# Altium PCB AHPR_Power_Management_and_Controls_Board.PcbDoc (part 2 of 2)
Units mil, origin at the board's own origin, x right, y up, seen from the top; angles counter-clockwise.
Board outline 2559.06 x 2204.72 mil, 2 copper layers (Top Layer, Bottom Layer), stack 63 mil thick; 89 components, 40 nets, 283 pads, 121 vias.
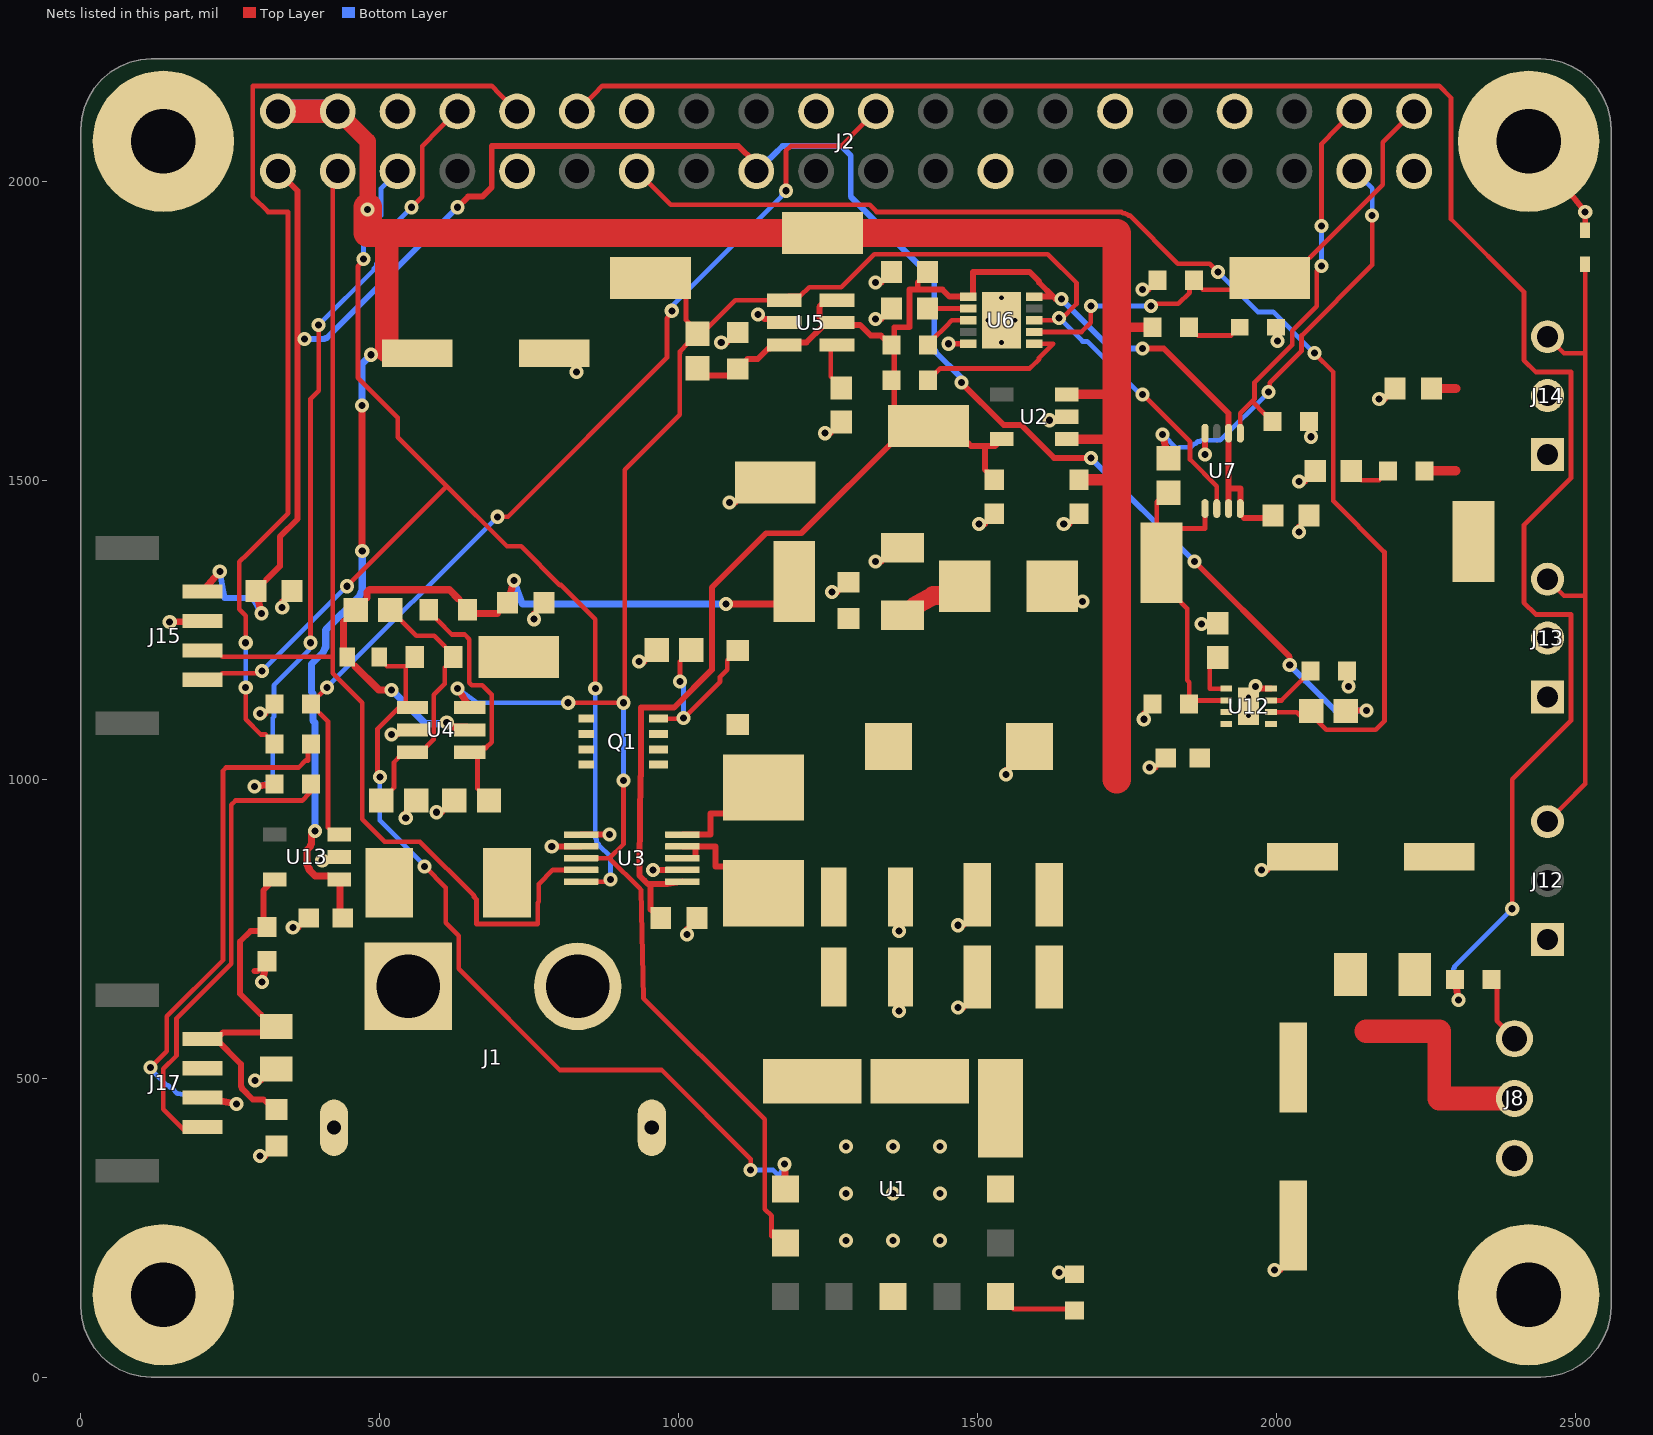
[diagram p2: the nets of this part, all layers, seen from the top]

## Part data (continued)
R52: library part CMP-2000-06932-2, "RES 20K OHM 1% 1/10W 0603 / 20 kOhms Â±1% 0.1W, 1/10W Chip Resistor 0603 (1608 Metric) Moisture Resistant Thick Film /  / SMD-RES-20K-1%-1/10W(0603) /  / https://octopart.com/part/yageo-group/RC0603FR-0720KL?slid=9dd42130-19c2-4799-ac31-5afd2b72cd34&ssid=b984c5c9-64c8-4793-b112-fa8b90893e5e#CadModels", Case Code (Imperial)=0603, Case Code (Metric)=1608, Max Operating Temperature=155°C, Max Power Dissipation=100mW, Min Operating Temperature=-55°C, Package Quantity=1, Resistance=20kR, Resistance Tolerance=1%, Resistor Type="Thick Film", Temperature Coefficient=100ppm/°C, Voltage Rating=50V, Case/Package=0603, Construction=Rectangular, Depth=0.8mm, Features="Moisture Resistant", Height=0.022inch, Lead Free="Lead Free", Length=0.063inch, Military Standard=Not, Number of Pins=2, Number of Terminations=2, Packaging="Tape and Reel", Power Rating=100mW, REACH SVHC="No SVHC", RoHS Compliant=Yes, Series=RC, Size Code=0603, Technology="THICK FILM", Termination=SMD/SMT, Tolerance=1%, Voltage Rating (DC)=50V, Width=0.031inch
R53: library part RC0603FR-072M2L, "Äiá»‡n trá»Ÿ mÃ ng dÃ y gáº¯n bá» máº·t, DÃ²ng RC, 2,2 Mohm, 100 mW, - 1%, 50 V, 0603 [1608 Metric] /  / RC0603FR-072M2L /  / https://octopart.com/part/yageo-group/RC0603FR-072M2L?slid=d71ab9d8-a679-4832-96ed-b1c44a9cfdb9&ssid=0251966b-910a-4a6a-9854-0248babda200#CadModels", Package="1608 Yageo", Check_prices=https://www.snapeda.com/parts/RC0603FR-072M2L/Yageo/view-part/?ref=eda, MF=Yageo, MP=RC0603FR-072M2L, SnapEDA_Link=https://www.snapeda.com/parts/RC0603FR-072M2L/Yageo/view-part/?ref=snap
R54: library part RC0603FR-07100KL, "RES, 100 k, 1%, 0.1 W, 0603 / Yageo RC0603FR-07100KL / 100 kΩ 1 % / 0603 / HEARTBEAT pulldown: TI says WDI must never float, and the Pi pin is Hi-Z while it boots / https://www.digikey.com/en/products/result?keywords=RC0603FR-07100KL", Manufacturer_Name=Yageo, Copyright="Copyright (C) 2025 Ultra Librarian. All rights reserved.", Manufacturer_Part_Number=RC0603FR-07100KL
R55: library part RC0603FR-07562RL, "Yageo RC0603FR-07562RL / 562 Ω 1 % / 0603 / ILM: I_LIM = 2000 / 562 + 0.04 ≈ 3.6 A (verify equation) / https://www.digikey.com/en/products/result?keywords=RC0603FR-07562RL", Manufacturer_Name=Yageo, Copyright="Copyright (C) 2026 Ultra Librarian. All rights reserved.", Manufacturer_Part_Number=RC0603FR-07562RL
R56: library part RC0603FR-07100KL, "RES, 100 k, 1%, 0.1 W, 0603 / Yageo RC0603FR-07100KL / 100 kΩ 1 % / 0603 / U12 EN pulldown: actuators off by default / https://www.digikey.com/en/products/result?keywords=RC0603FR-07100KL", Manufacturer_Name=Yageo, Copyright="Copyright (C) 2025 Ultra Librarian. All rights reserved.", Manufacturer_Part_Number=RC0603FR-07100KL
R57: library part RC0603FR-0710KL, "10 kOhms Â±1% 0.1W, 1/10W Chip Resistor 0603 (1608 Metric) Moisture Resistant Thick Film / Yageo RC0603FR-0710KL / 10 kΩ 1 % / 0603 / FLT pull-up to +3V3_PI (ACT_FAULT_n) / https://www.digikey.com/en/products/result?keywords=RC0603FR-0710KL", Package="0603 Yageo", Check_prices=https://www.snapeda.com/parts/RC0603FR-0710KL/Yageo/view-part/?ref=eda, MF=Yageo, MP=RC0603FR-0710KL, SnapEDA_Link=https://www.snapeda.com/parts/RC0603FR-0710KL/Yageo/view-part/?ref=snap
R58 R59: library part RC0603FR-071KL, "RES SMD 1K OHM 1% 1/10W 0603 / Yageo RC0603FR-071KL / 1 kΩ 1 % / 0603 / UART series to the rangefinder: limits back-feed into its pins while it is unpowered / https://www.digikey.com/en/products/result?keywords=RC0603FR-071KL", Manufacturer_Name=Yageo, Copyright="Copyright (C) 2025 Ultra Librarian. All rights reserved.", Manufacturer_Part_Number=RC0603FR-071KL
R62: library part RC0603FR-07100KL, "RES, 100 k, 1%, 0.1 W, 0603 / Yageo RC0603FR-07100KL / 100 kΩ 1 % / 0603 / RF_POWER_EN pulldown: rangefinder off at boot / https://www.digikey.com/en/products/result?keywords=RC0603FR-07100KL", Manufacturer_Name=Yageo, Copyright="Copyright (C) 2025 Ultra Librarian. All rights reserved.", Manufacturer_Part_Number=RC0603FR-07100KL
"TP1 VBAT_RAW" TP2 "TP3 GND": "Test Point Micro Mini SMT Phos Bronze/Silver 1000pc Tape & Reel", Package=None, Check_prices=https://www.snapeda.com/parts/5015/Keystone/view-part/?ref=eda, MF="Keystone Electronics", MP=5015, SnapEDA_Link=https://www.snapeda.com/parts/5015/Keystone/view-part/?ref=snap
TP4 TP5 TP6 TP7 TP8 TP9: library part 5015, "Test Point Micro Mini SMT Phos Bronze/Silver 1000pc Tape & Reel", Package=None, Check_prices=https://www.snapeda.com/parts/5015/Keystone/view-part/?ref=eda, MF="Keystone Electronics", MP=5015, SnapEDA_Link=https://www.snapeda.com/parts/5015/Keystone/view-part/?ref=snap
U1: library part OKL-T_6-W12P-C, "MURATA POWER SOLUTIONS - OKL-T/6-W12P-C - DC-DC CONVERTER, 0.591V TO 5.5V, MODULE", Arrow Part Number=OKL-T/6-W12P-C, Manufacturer_Name="Murata Electronics", Mouser Part Number=580-OKL-T/6-W12P-C, Arrow Price/Stock=https://www.arrow.com/en/products/okl-t6-w12p-c/murata-power-solutions?region=nac, Datasheet Link=https://www.murata.com/products/productdata/8807038255134/okl-t6-w12.pdf?1583754815000, Geometry.Height=7.2mm, Manufacturer_Part_Number=OKL-T/6-W12P-C, Mouser Price/Stock=https://www.mouser.co.uk/ProductDetail/Murata-Power-Solutions/OKL-T-6-W12P-C?qs=CxV9Ey7RZVdXGDAP%2FweYNg%3D%3D
U2: library part TLV75533PDBVR, "500mA high-PSRR low-I<sub>Q</sub> low-dropout voltage regulator with enable 5-SOT-23 -40 to 125 / TI TLV75533PDBVR / 3.3 V 500 mA LDO /  / https://www.digikey.com/en/products/detail/texas-instruments/TLV75533PDBVR/9356541", Manufacturer_Name="Texas Instruments", Copyright="Copyright (C) 2026 Ultra Librarian. All rights reserved.", Manufacturer_Part_Number=TLV75533PDBVR, RefDes=RefDes, Type=TYPE
U3: "36V, 16-bit, ultra-precise i2c output current/voltage/power monitor w/alert", Package="VSSOP-10 Texas Instruments", Check_prices=https://www.snapeda.com/parts/INA226AIDGSR/Texas+Instruments/view-part/?ref=eda, MF="Texas Instruments", MP=INA226AIDGSR, SnapEDA_Link=https://www.snapeda.com/parts/INA226AIDGSR/Texas+Instruments/view-part/?ref=snap
U4: "High-voltage (18-V) window voltage detector for overvoltage and undervoltage monitoring 6-SOT-23-THIN -40 to 125", Manufacturer_Name="Texas Instruments", Copyright="Copyright (C) 2026 Ultra Librarian. All rights reserved.", Manufacturer_Part_Number=TPS3700DDCR, RefDes=RefDes, Type=Type
U5: library part TPS3808G33DBVR, "Low-quiescent current supervisor with programmable delay & manual reset 6-SOT-23 -40 to 125", Manufacturer_Name="Texas Instruments", Copyright="Copyright (C) 2025 Ultra Librarian. All rights reserved.", Manufacturer_Part_Number=TPS3808G33DBVR, RefDes=RefDes, Type=Type
U6: library part TPS3430WDRCR, "Window watchdog timer with programmable reset delay 10-VSON -40 to 125", Manufacturer_Name="Texas Instruments", Copyright="Copyright (C) 2026 Ultra Librarian. All rights reserved.", Manufacturer_Part_Number=TPS3430WDRCR, RefDes=RefDes, Type=TYPE
U7: library part SN74LVC1G74DCUR, "Single Positive-Edge-Triggered D-Type Flip-Flop With Clear and Preset 8-VSSOP -40 to 125", Alternate_PartNumber=SN74LVC1G74DCUT, Manufacturer="Texas Instruments", CompType=IC, Copyright="Copyright (C) 2026 Ultra Librarian. All rights reserved.", Manufacturer_Name="Texas Instruments", Manufacturer_Part_Number=SN74LVC1G74DCUR, MountType=SMT, PackageReference=DCU0008A, PartNumber=SN74LVC1G74DCUR, RefDes=RefDes, RoHS=Y, Type=TYPE
U12: "2.7-V to 18-V, 34m&Omega;, 0.5-4A eFuse with over voltage protection in small WSON package 8-WSON -40 to 125", Manufacturer_Name="Texas Instruments", Copyright="Copyright (C) 2025 Ultra Librarian. All rights reserved.", Manufacturer_Part_Number=TPS259530DSGR, RefDes=RefDes, Type=TYPE
U13: library part TLV75533PDBVR, "500mA high-PSRR low-I<sub>Q</sub> low-dropout voltage regulator with enable 5-SOT-23 -40 to 125 / TI TLV75533PDBVR / 3.3 V 500 mA LDO with enable / SOT-23-5 / +3V3_RF for the rangefinder; EN = RF_POWER_EN (GPIO25) / https://www.digikey.com/en/products/detail/texas-instruments/TLV75533PDBVR/9356541", Manufacturer_Name="Texas Instruments", Copyright="Copyright (C) 2026 Ultra Librarian. All rights reserved.", Manufacturer_Part_Number=TLV75533PDBVR, RefDes=RefDes, Type=TYPE

## Via types
v1: diameter 23.62, hole 11.81, Top Layer to Bottom Layer, 121 vias

## Nets (pads, with @x,y where several pads share a name; then routed paths per layer and width w, separated by ;. In a path a pad name is that pad's centre, name@x,y a point inside that pad or via, vN(x,y) a via of type N, cw(c..) or ccw(c..) an arc to the next point about the centre after c; other vN are vias at no path point)
+3V3_LOGIC: C4.1 C12.1 C27.2 C28.2 C30.2 R33.2 R34.2 R35.1 TP5.TP U2.5 U3.6 U5.3 U5.5 U5.6 U6.1 U6.10 U7.2 U7.7 U7.8 | length 2694.6
  Top Layer w9.84: 947.41,825.44 942.28,830.57 934.06,839.05 934.06,857.8 935.95,1004.85 937.01,1005.91 937.01,1120.08 992.13,1120.08 1055.12,1183.07 1055.12,1320.87 1145.67,1411.42 1204.72,1411.42 TP5.TP@1366.65,1573.35 ; 948.17,824.8 952.76,824.8 981.23,824.8 1002.2,828.15 U3.6@1005.91,828.74 ; 952.76,823.82 952.76,782.24 C4.1@960,775 ; R35.1@1050.35,1675 1079.88,1675 ; C27.2@1098.43,1686.22 1114.96,1702.76 1131.89,1702.76 1149.43,1720.3 1152.39,1720.3 1156.1,1724.01 U5.3@1156.1,1726.97 ; U5.3@1180.97,1725 1186.6,1730.63 1213.41,1730.63 1240.39,1757.61 1240.39,1757.7 1241.33,1758.64 U5.5@1241.42,1758.64 ; U5.5@1240,1765 1235,1770 1235,1790 U5.6@1245,1800 ; U5.5@1264.47,1763.78 1268.25,1760 1302.99,1760 1320.87,1742.13 1337.87,1742.13 R33.2@1345,1735 ; TP5.TP@1360.24,1624.02 1360.24,1726.38 1360.24,1755.91 1385.83,1755.91 1385.83,1818.9 1399.61,1818.9 ; C28.2@1399.61,1830.71 1399.61,1818.9 ; TP5.TP@1482.99,1562.8 1488.7,1557.09 1511.81,1557.09 ; U6.1@1484.25,1807.09 1452.76,1807.09 1440.94,1818.9 1399.61,1818.9 ; U6.1@1492.13,1812.99 1492.13,1848.43 1586.61,1848.43 1602.36,1832.68 1602.36,1830.71 1625.98,1807.09 ; C12.1@1520,1510 1511.81,1518.19 1511.81,1557.09 ; U2.5@1540.35,1568.9 1528.54,1557.09 1511.81,1557.09 ; U6.10@1594.49,1807.09 1625.98,1807.09 ; v1(1639.76,1803.15) 1629.92,1803.15 1625.98,1807.09 ; v1(1775.59,1720.47) 1811.02,1720.47 1919.29,1612.2 U7.2@1919.29,1578.74 ; U7.7@1919.29,1452.76 1919.29,1486.22 ; U7.2@1919.29,1562.99 1919.29,1486.22 ; U7.8@1938.98,1452.76 1938.98,1486.22 1919.29,1486.22 ; 1944.88,1437.01 C30.2@1976.38,1437.01
  Bottom Layer w9.84: v1(1639.76,1803.15) 1722.44,1720.47 v1(1775.59,1720.47)
+3V3_PI: C42.2 J2.1 J2.17 J15.1 R57.2 | length 3475.8
  Top Layer w9.84: C42.2@309.06,1332.68 332.68,1356.3 332.68,1405.51 362.2,1435.04 362.2,1736.22 ; J2.1@329.53,2016.93 362.2,1984.25 362.2,1736.22 ; v1(374.02,1736.22) 362.2,1736.22 ; v1(629.92,1956.69) 647.64,1974.41 671.26,1974.41 687.01,1990.16 687.01,2059.06 1099.29,2059.06 1126.47,2032.61 1129.35,2029.73 J2.17@1129.53,2016.93 ; v1(1472.44,1663.39) 1543.31,1592.52 1572.48,1592.52 1627.6,1537.4 v1(1688.98,1537.4) ; v1(1862.2,1364.17) 2021.65,1204.72 v1(2021.65,1190.94) ; R57.2@2115.55,1114.17 2116.38,1115 v1(2150,1115)
  Top Layer w11.81: J15.1@203.74,1313.98 v1(232.28,1347.76) ; C42.2@292.52,1314.96 v1(302.17,1277.56)
  Bottom Layer w9.84: v1(232.28,1347.76) 240.16,1303.15 287.4,1303.15 v1(302.17,1277.56) ; v1(374.02,1736.22) 407.48,1736.22 409.45,1738.19 411.42,1738.19 v1(629.92,1956.69) ; J2.17@1129.53,2016.93 1159.45,2045.28 1173.23,2059.06 1271.65,2059.06 1287.4,2043.31 1287.4,1974.41 1427.17,1834.65 1427.17,1718.5 1429.13,1716.54 1429.13,1714.57 1472.44,1671.26 v1(1472.44,1663.39) ; v1(1688.98,1537.4) v1(1862.2,1364.17) ; v1(2021.65,1190.94) 2076.77,1135.83 2097.28,1115.32 v1@2149.68,1115.32
+3V3_RF: C44.2 C46.2 C47.2 J17.1 U13.5 | length 513.5
  Top Layer w9.84: J17.1@215,565 J17.1@226.34,565 ; C46.2@295.28,746.06 283.46,746.06 266.15,728.75 266.15,641.33 C47.2@301.18,606.3 ; C47.2@301.18,576.77 238.11,576.77 J17.1@226.34,565 ; C46.2@305.12,769.69 305.12,813.98 U13.5@323.82,832.68 ; C44.2@330,440 305.43,464.57 287.4,464.57 269.68,482.28 269.68,484.25 267.72,486.22 267.72,523.62 J17.1@226.34,565
+5V: C8.2 C9.2 C10.1 C11.1 C38.2 C45.2 J2.2 J2.4 R10.2 TP4.TP U1.4 U1.5 U2.1 U2.3 U12.3 U12.4 U13.1 | length 4343.8
  Top Layer w11.81: v1(391.73,913.39) 385.83,907.48 385.83,891.73 383.86,889.76 383.86,887.8 377.95,881.89 377.95,856.3 379.92,854.33 379.92,852.36 381.89,850.39 381.89,848.43 391.73,838.58 U13.1@413.39,838.58 ; C45.2@433.07,783.46 U13.1@433.07,820.87 ; v1(470,1625) 470.24,1624.76 470.24,1382.13 v1(470.47,1381.89) ; v1(485,1710) 524.5,1710 527.09,1712.6 C10.1@562.67,1712.6
  Top Layer w15.75: U2.1@1661.42,1568.9 1732.28,1568.9 ; U2.3@1661.42,1643.7 1732.28,1643.7 ; 1732.28,1755.91 R10.2@1791.34,1755.91
  Top Layer w19.68: C11.1@1669.29,1500.79 1732.28,1500.79
  Top Layer w27.56: J2.4@429.53,2116.93 479.53,2066.93 479.53,1913.39
  Top Layer w39.37: J2.2@329.53,2116.93 J2.4@429.53,2116.93 ; C10.1@511.81,1716.54 511.81,1913.39
  Top Layer w47.24: v1@479.53,1956.69 479.53,1913.39 511.81,1913.39 1732.28,1913.39 1732.28,1000
  Bottom Layer w11.81: v1(391.73,913.39) 391.73,1094.49 387.8,1098.43 387.8,1143.7 385.83,1145.67 385.83,1192.91 405.51,1212.6 405.51,1214.57 407.48,1216.54 407.48,1218.5 409.45,1220.47 409.45,1250 466.54,1307.09 466.54,1309.06 468.5,1311.02 468.5,1312.99 470.47,1314.96 v1(470.47,1381.89) ; v1(470,1625) 470,1695 v1(485,1710)
  Bottom Layer w23.62: J2.4@429.53,2116.93 479.53,2066.93 v1(479.53,1952.76)
  Bottom Layer w39.37: J2.2@329.53,2116.93 J2.4@429.53,2116.93
+5V_ACT: C40.1 C41.2 FB1.1 J13.2 J14.2 R41.1 TP6.TP U12.5 | length 66.9
  Top Layer w15.75: R41.1@2259.84,1515.75 2299.21,1515.75 ; C41.2@2271.65,1653.54 2299.21,1653.54
+5V_SERVO: C13.1 FB1.2 J8.2 | length 360.6
  Top Layer w39.37: 2149.61,578.74 2271.65,578.74 2271.65,466.14 2374.02,466.14 J8.2@2397.64,466.14
ACT_FAULT_n: J2.13 R57.1 U12.6 | length 2131.3
  Top Layer w7.87: J2.13@929.53,2016.93 958.66,1988.19 986.22,1960.63 1318.9,1960.63 1330.71,1948.82 1740.16,1948.82 1742.13,1946.85 1746.06,1946.85 1748.03,1944.88 1750,1944.88 1751.97,1942.91 1753.94,1942.91 1834.65,1862.2 1887.8,1862.2 v1(1901.57,1848.43) ; U12.6@1990.16,1112.2 2017.72,1112.2 2033.46,1112.2 2045.28,1100.39 2064.96,1100.39 2082.68,1082.68 2165.39,1082.68 2180,1097.29 2180,1380 2094.49,1465.51 2094.49,1681.1 v1(2062.99,1712.6)
  Bottom Layer w7.87: v1(1901.57,1848.43) 1968.5,1781.5 1994.09,1781.5 v1(2062.99,1712.6)
BUCK_EN: R52.2 R53.1 U1.1 U4.1 | length 1357.7
  Top Layer w7.87: v1(500,1003.94) 496.06,1007.87 496.06,1084.65 531.42,1120 U4.1@540,1120 ; R52.2@511.81,1188.98 R53.1@543.31,1188.98 ; U4.1@543.31,1129.92 R53.1@543.31,1187.01 ; v1(574.8,854.33) 610.24,818.9 610.24,759.84 631.89,738.19 631.89,683.07 801.18,513.78 971.22,513.78 1120.08,364.92 v1(1120.08,346.46)
  Top Layer w11.81: v1(1176.46,356.22) U1.1@1178.35,314.96
  Bottom Layer w7.87: v1(500,1003.94) 500,931.1 572.83,858.27 572.83,856.3 v1(574.8,854.33) ; v1(1120.08,346.46) 1157.48,346.46 1167.32,336.61 v1(1176.46,356.22)
DXL_DATA: D9.1 J12.3 J13.3 J14.3 | length 1107.8
  Top Layer w7.87: J12.3@2452.76,929.13 2480.31,956.69 2515.75,992.13 2515.75,1830.71 2515.75,1830.32 D9.1@2515.75,1861.22 ; J13.3@2452.76,1334.65 2480.31,1307.09 2515.75,1307.09 ; J14.3@2452.76,1740.16 2480.31,1712.6 2515.75,1712.6
GND: "TP3 GND.TP" C1.2 C2.2 C3.2 C4.2 C5.2 C6.2 C7.2 C8.1 C9.1 C10.2 C11.2 C12.2 C13.2 C26.1 C27.1 C28.1 C29.1 C30.1 C38.1 C39.2 C40.2 C41.1 C42.1 C44.1 C45.1 C46.1 C47.1 D1.2 D3.1 D5.C D9.2 H1.1 H2.1 H3.1 H4.1 J1.2 J1.SH1 J1.SH2 J2.6 J2.9 J2.14 J2.20 J2.25 J2.30 J2.34 J2.39 J8.1 J12.1 J13.1 J14.1 J15.2 J17.2 R1.1 R6.2 R8.1 R9.2 R36.2 R54.1 R55.2 R56.1 R62.1 U1.3 U1.7 U2.2 U3.1 U3.2 U3.7 U4.2 U5.2 U6.5 U6.11 U7.4 U12.8 U12.9 U13.2 | length 1137.5
  Top Layer w9.84: 290.54,679.13 C46.1@295.28,679.13 ; v1(291.34,496.06) C47.1@301.18,496.06 ; v1(299.21,370.08) C44.1@309.06,370.08 ; v1(299.21,1110.24) R62.1@309.06,1110.24 ; v1(336.61,1287.4) C42.1@336.61,1297.24 ; v1(354.33,751.97) C45.1@364.17,751.97 ; v1(403.54,864.17) U13.2@413.39,864.17 ; v1(519.68,1074.8) U4.2@529.53,1074.8 ; v1(543.31,935.04) R6.2@543.31,944.88 ; v1(594.49,944.88) R8.1@604.33,944.88 ; v1(757.87,1267.72) C5.2@757.87,1277.56 ; v1(787.4,887.8) U3.2@836.61,887.8 ; v1(828.74,1681.1) C10.2@828.74,1690.94 ; U3.1@836.61,907.48 v1(883.86,907.48) ; v1(933.07,1196.85) R1.1@942.91,1196.85 ; v1(956.69,848.43) U3.7@1005.91,848.43 ; v1(1013.78,740.16) C4.2@1013.78,750 ; v1(1070.87,1730.32) C27.1@1080.71,1730.32 ; v1(1084.65,1462.6) v1@1094.49,1462.6 ; v1(1132.1,1777.16) 1135.83,1777.16 1143.13,1769.86 1170.39,1769.86 U5.2@1176.47,1763.78 ; v1(1244.09,1578.74) C26.1@1253.94,1578.74 ; v1(1255.91,1312.99) C3.2@1265.75,1312.99 ; v1(1328.74,1364.17) C2.2@1338.58,1364.17 ; v1(1328.74,1769.69) C29.1@1338.58,1769.69 ; v1(1328.74,1830.71) C28.1@1338.58,1830.71 ; v1(1368.11,612.2) C6.2@1368.11,622.05 ; v1(1368.11,746.06) C7.2@1368.11,755.91 ; v1(1450.79,1728.35) U6.5@1484.25,1728.35 ; v1(1466.54,618.11) C8.1@1476.38,618.11 ; v1(1466.54,755.91) C9.1@1476.38,755.91 ; v1(1501.97,1427.17) C12.2@1511.81,1427.17 ; v1(1547.24,1007.87) C1.2@1547.24,1015.75 ; v1(1620.08,1600.39) U2.2@1629.92,1600.39 ; v1(1635.83,175.2) R9.2@1645.67,175.2 ; v1(1643.7,1427.17) C11.2@1653.54,1427.17 ; D1.2@1665.35,1297.24 v1(1675.2,1297.24) ; v1(1775.59,1818.9) R54.1@1785.43,1818.9 ; v1(1777.56,1100.39) R56.1@1777.56,1110.24 ; v1(1787.4,1019.69) C38.1@1797.24,1019.69 ; v1(1874.02,1259.84) C39.2@1883.86,1259.84 ; v1(1879.92,1543.31) U7.4@1879.92,1578.74 ; v1(1964.57,1155.51) 1962.6,1153.54 1962.6,1151.57 U12.8@1990.16,1151.57 ; v1(1974.41,848.43) C40.2@1984.25,848.43 ; v1(1996.06,179.13) C13.2@2005.91,179.13 ; v1(2001.42,1732.83) 2001.97,1733.38 D3.1@2001.97,1742.13 ; v1(2037.4,1413.39) C30.1@2037.4,1423.23 ; v1(2037.4,1498.03) D5.C@2047.24,1498.03 ; v1(2057.09,1572.83) R36.2@2057.09,1582.68 ; v1(2120.08,1155.51) R55.2@2120.08,1165.35 ; v1(2171.26,1635.83) C41.1@2181.1,1635.83 ; D9.2@2515.75,1918.31 v1@2515.75,1949.21 ; v1@2515.75,1949.21 v1(2515.75,1948.82) H4.1@2421.26,2066.93 v1@2515.75,1949.21
  Top Layer w11.81: v1(148.5,1262.95) J15.2@203.74,1264.76 ; v1(302.72,660.79) C46.1@311.02,695.91
  other v1: 1279.53,228.35 1358.27,228.35 1437.01,228.35 1279.53,307.09 1358.27,307.09 1437.01,307.09 1279.53,385.83 1358.27,385.83 1437.01,385.83
HEARTBEAT: J2.40 R54.2 TP9.TP U6.7 | length 689.3
  Top Layer w7.87: U6.7@1594.49,1748.03 1673.23,1748.03 1688.98,1763.78 v1(1688.98,1791.34) ; v1(1789.37,1791.34) 1793.31,1795.28 1835.28,1795.28 1854.05,1814.05 1854.05,1822.58 1864.34,1832.87 R54.2@1865,1832.87 ; R54.2@1875.98,1818.9 TP9.TP@1921.26,1818.9 ; TP9.TP@2055.12,1872.05 2177.17,1994.09 2177.17,2064.96 2200.79,2088.58 J2.40@2229.53,2116.93
  Bottom Layer w7.87: v1(1688.98,1791.34) v1(1789.37,1791.34)
I2C_SCL: J2.5 J15.4 U3.5 | length 1958.9
  Top Layer w7.87: J15.4@236.22,1177.17 299.21,1177.17 v1(303.15,1181.1) ; v1(444.88,1322.83) 612.2,1490.16 ; v1(472.44,1870.08) 472.44,1866.69 463.35,1857.59 463.35,1671.65 530,1605 530,1572.36 612.2,1490.16 ; U3.5@836.61,828.74 883.27,828.74 883.86,828.74 883.86,830.71 v1(885.83,832.68) ; v1(860.24,1151.57) 860.24,1267.72 803.15,1324.8 801.18,1324.8 736.22,1389.76 712.6,1389.76 612.2,1490.16
  Bottom Layer w7.87: v1(303.15,1181.1) v1(444.88,1322.83) ; v1(472.44,1870.08) 472.44,1911.42 500,1938.98 500,1940.94 501.97,1942.91 501.97,1988.19 J2.5@529.53,2016.93 ; v1(860.24,1151.57) 860.24,901.57 862.2,899.61 862.2,895.67 866.14,891.73 866.14,889.76 885.83,870.08 v1(885.83,832.68)
I2C_SDA: J2.3 J15.3 U3.4 | length 1830.1
  Top Layer w7.87: J15.3@236.22,1204.72 421.26,1204.72 ; J2.3@429.53,2016.93 421.26,1988.19 421.26,1177.17 470.47,1127.95 470.47,933.07 507.87,895.67 566.93,895.67 657.48,805.12 657.48,803.15 661.42,799.21 661.42,757.87 763.78,757.87 763.78,793.31 765.75,795.28 765.75,824.8 789.37,848.43 789.96,848.43 U3.4@836.61,848.43
LED_ACT: D5.A R41.2 | length 29.5
  Top Layer w7.87: D5.A@2141.73,1500 R41.2@2171.26,1500
MOTOR_ARM: J2.38 R36.1 U7.1 | length 655.3
  Top Layer w7.87: U7.1@1938.98,1578.74 1938.98,1612.2 1958.66,1631.89 ; R36.1@1984.66,1605.89 1984.66,1607.88 1982.06,1610.49 1980.06,1610.49 1958.66,1631.89 ; v1(2074.8,1858.27) 2066.93,1850.39 2066.93,1791.34 2025.59,1750 2025.59,1726.38 1962.6,1663.39 1962.6,1635.83 1958.66,1631.89 ; v1(2074.8,1925.2) 2074.8,2062.99 2100.39,2088.58 J2.38@2129.53,2116.93
  Bottom Layer w7.87: v1(2074.8,1858.27) v1(2074.8,1925.2)
MOTOR_SAFE_EN: R40.1 R56.2 TP8.TP U7.5 U12.2 | length 351.4
  Top Layer w7.87: TP8.TP@1799.21,1429.13 1799.21,1464.21 R40.1@1805,1470 ; TP8.TP@1840.55,1295.28 1850.39,1285.43 1850.39,1165.39 1853.33,1162.45 R56.2@1853.33,1125.98 ; TP8.TP@1840.55,1419.29 1879.92,1419.29 U7.5@1879.92,1452.76 ; R56.2@1854.33,1131.59 U12.2@1915.05,1131.59
MOTOR_SAFE_EN_STAT: J2.37 R40.2 | length 721.1
  Top Layer w7.87: v1(1986.22,1647.64) 1988.26,1649.68 1988.26,1663.26 2041.34,1716.34 2041.34,1742.13 2159.45,1860.24 v1(2159.45,1942.91)
  Top Layer w11.81: v1(1809.02,1576.81) R40.2@1818.9,1536.81
  Bottom Layer w7.87: v1(1809.02,1576.81) 1832.68,1553.15 1834.65,1553.15 1836.61,1555.12 1856.3,1555.12 1862.2,1561.02 1864.17,1561.02 1868.11,1564.96 1872.05,1564.96 1874.02,1566.93 1905.51,1566.93 v1(1986.22,1647.64) ; J2.37@2129.53,2016.93 2159.45,1988.19 v1(2159.45,1942.91)
NetC26_2: C26.2 U5.4 | length 43.3
  Top Layer w7.87: C26.2@1253.94,1673.23 U5.4@1253.94,1716.54
NetC29_2: C29.2 U6.2 | length 51.2
  Top Layer w7.87: C29.2@1433.07,1787.4 1452.76,1787.4 U6.2@1484.25,1787.4
NetC39_1: C39.1 U12.1 | length 61
  Top Layer w7.87: C39.1@1887.8,1185.04 1887.8,1151.57 U12.1@1915.35,1151.57
NetD3_2: D3.2 R10.1 | length 55.1
  Top Layer w7.87: R10.1@1868.11,1742.13 D3.2@1923.23,1742.13
NetR9_1: R9.1 U1.6 | length 86.6
  Top Layer w7.87: U1.6@1559.06,114.17 R9.1@1645.67,114.17
NetR33_1: R33.1 U6.3 | length 73.1
  Top Layer w7.87: R33.1@1424.49,1735.51 1446.99,1758.01 1456.69,1767.72 U6.3@1484.25,1767.72
NetR34_1: R34.1 U6.6 | length 255.7
  Top Layer w7.87: R34.1@1425,1675 1437.01,1687.01 1586.61,1687.01 1588.92,1689.31 1602.36,1702.76 1602.36,1704.72 1625.98,1728.35 U6.6@1594.49,1728.35
NetR55_1: R55.1 U12.7 | length 70.9
  Top Layer w7.87: U12.7@1990.16,1131.89 2007.87,1131.89 R55.1@2045.49,1169.51
OV_SENSE: R7.1 R8.2 U4.4 | length 347.8
  Top Layer w7.87: R7.1@596.46,1265.75 620.08,1242.13 641.73,1242.13 649.61,1234.25 649.61,1161.42 653.54,1157.48 671.26,1157.48 687.01,1141.73 687.01,1062.01 677.34,1052.34 672.43,1052.34 666.22,1046.13 U4.4@666.22,1041.22 ; R8.2@663.39,984.25 U4.4@663.39,1035.43
PI_RXD: J2.10 R59.1 | length 1645
  Top Layer w7.87: v1(275.59,1153.54) 275.59,1100.39 301.18,1074.8 R59.1@309.06,1074.8 ; v1(275.59,1228.35) 275.59,1273.62 265,1284.21 265,1363.43 277.99,1376.42 346.46,1444.88 346.46,1948.82 312.99,1948.82 287.4,1974.41 287.4,2159.45 687.01,2159.45 700.79,2145.67 J2.10@729.53,2116.93
  Bottom Layer w7.87: v1(275.59,1153.54) v1(275.59,1228.35)
PI_TXD: J2.8 R58.1 | length 1314.1
  Top Layer w7.87: v1(383.86,1228.35) 383.86,1635.83 397.64,1649.61 v1(397.64,1759.84) ; v1(553.15,1956.69) 570.87,1974.41 570.87,2059.06 600.39,2088.58 J2.8@629.53,2116.93
  Top Layer w11.81: v1(290.43,987.91) R58.1@323.83,992.13
  Bottom Layer w7.87: v1(290.43,987.91) 320.87,996.06 320.87,1102.36 322.83,1104.33 322.83,1157.48 381.89,1216.54 381.89,1226.38 v1(383.86,1228.35) ; v1(397.64,1759.84) 490.16,1852.36 490.16,1854.33 494.09,1858.27 494.09,1862.2 496.06,1864.17 496.06,1899.61 v1(553.15,1956.69)
Q1_GATE: D2.2 Q1.4 R1.2 | length 266
  Top Layer w7.87: Q1.4@966.02,1101.38 999.49,1101.38 1000,1102.36 v1(1007.87,1102.36) 1068.9,1163.39 1068.9,1171.26 1080.71,1183.07 D2.2@1080.71,1198.82 ; v1(1001.97,1163.39) R1.2@1001.97,1196.85
  Bottom Layer w7.87: v1(1001.97,1163.39) 1007.87,1157.48 v1(1007.87,1102.36)
RF_POWER_EN: J2.22 R62.2 U13.3 | length 1616.7
  Top Layer w7.87: R62.2@399.61,1110.24 413.39,1096.46 413.39,919.29 ; R62.2@399.61,1141.73 v1(411.42,1153.54) ; v1(696.85,1438.98) 697.12,1439.24 714.24,1439.24 980,1705 980,1771.01 988.19,1779.2 v1(988.19,1783.46) ; v1(1179.13,1984.25) 1179.13,2051.18 1187.01,2059.06 1271.65,2059.06 1301.18,2088.58 J2.22@1329.53,2116.93
  Bottom Layer w7.87: v1(411.42,1153.54) v1(696.85,1438.98) ; v1(988.19,1783.46) 988.19,1791.34 1171.26,1974.41 1171.26,1976.38 v1(1179.13,1984.25)
RF_RX: J17.4 R58.2 | length 745.4
  Top Layer w7.87: J17.4@173.63,412.57 137.8,448.41 137.8,515.83 160,538.03 160,600 251.39,691.39 251.39,957.22 258.55,964.38 370,964.38 R58.2@382.25,976.62
RF_TX: J17.3 R59.2 | length 930.5
  Top Layer w7.87: v1(116.14,517.72) 143.7,545.28 143.7,603.7 237.61,697.61 237.61,1014.49 242.8,1019.69 364.17,1019.69 375.98,1031.5 379.92,1031.5 R59.2@379.92,1043.31
  Top Layer w11.81: J17.3@203.74,467.52 v1(260.28,456.97)
  Bottom Layer w7.87: v1(116.14,517.72) 116.14,515.75 143.7,488.19 145.67,488.19 149.61,484.25 151.57,484.25 161.42,474.41 v1(260.28,456.97)
SAFE_OK: R35.2 TP7.TP U1.10 U3.3 U4.6 U5.1 U6.8 U7.6 | length 3379.2
  Top Layer w7.87: v1(814.96,1127.95) v1(907.48,1127.95) 907.48,1135.83 909.45,1137.8 909.45,1517.72 1001.57,1609.84 1001.57,1712.15 1001.97,1712.54 1001.97,1715.95 1014.96,1728.94 1015.35,1728.94 1031.5,1745.08 R35.2@1031.5,1745.47 ; U3.3@836.61,868.11 883.86,868.11 ; v1(907.48,998.03) 907.48,891.73 883.86,868.11 ; TP7.TP@1011.81,1805.12 1011.81,1768.19 R35.2@1020,1760 ; R35.2@1023.31,1730 1094.49,1801.18 U5.1@1176.47,1801.18 1183.54,1808.24 1203.24,1808.24 1217.83,1822.83 1271.65,1822.83 1326.77,1877.95 1617.05,1877.95 1665,1830 1665,1794.92 1638.78,1768.7 1637.8,1767.72 v1@1635.83,1767.72 ; 1155,235.99 1155,270 1143.7,281.3 1143.7,431.1 1129.92,444.88 940.84,633.97 936.63,815.34 934.4,817.57 883.86,868.11 ; U6.8@1594.49,1767.72 v1@1635.83,1767.72 ; v1(1635.83,1771.65) v1@1635.83,1767.72 ; v1(1775.59,1643.7) 1855,1564.29 1855,1534.76 1899.61,1490.16 U7.6@1899.61,1452.76
  Top Layer w11.81: v1(629.53,1151.65) U4.6@650.36,1120.08
  Bottom Layer w7.87: v1(629.53,1151.65) 663.39,1127.95 v1(814.96,1127.95) ; v1(907.48,998.03) v1(907.48,1127.95) ; v1(1635.83,1771.65) 1675.2,1732.28 1683.07,1732.28 1771.65,1643.7 v1(1775.59,1643.7)
SERVO_PWM: J2.12 R45.2 | length 3331.7
  Top Layer w7.87: J2.12@829.53,2116.93 858.27,2145.67 872.05,2159.45 2271.65,2159.45 2291.34,2139.76 2291.34,1937.01 2413.39,1814.96 2413.39,1700.79 2433.07,1681.1 2492.13,1681.1 2492.13,1503.94 2413.39,1425.2 2413.39,1295.28 2433.07,1275.59 2492.13,1275.59 2492.13,1098.43 2393.7,1000 v1(2393.7,783.46)
  Top Layer w11.81: R45.2@2298.24,665.35 v1(2304.17,630.71)
  Bottom Layer w7.87: v1(2304.17,630.71) 2295.28,681.1 2295.28,683.07 2297.24,685.04 2297.24,687.01 v1(2393.7,783.46)
SERVO_PWM_J: J8.3 R45.1 | length 95.5
  Top Layer w7.87: R45.1@2368.11,649.61 2368.11,596.46 J8.3@2397.64,566.14
UV_SENSE: R5.2 R6.1 R53.2 U4.3 | length 293.4
  Top Layer w7.87: R6.1@521.65,984.25 523.62,986.22 523.62,1028.62 U4.3@535,1040 ; R5.2@537.4,1263.78 561.02,1240.16 590.55,1240.16 R53.2@608.27,1222.44 ; U4.3@578.74,1055.12 590.2,1066.58 590.2,1141.39 608.27,1159.45 R53.2@608.27,1187.01
VBAT_IN: F1.1 J1.1
VBAT_PROTECTED: C1.1 C2.1 C3.1 C5.1 C6.1 C7.1 D1.1 R2.2 R5.1 R7.2 R52.1 TP2.TP U1.2 U3.8 U3.9 U4.5 | length 1211.8
  Top Layer w9.84: U3.8@1005.91,868.11 1027.56,868.11 U3.9@1027.56,887.8 ; U3.9@1005.91,887.8 1061.02,887.8 1061.02,854.33 R2.2@1086.61,854.33
  Top Layer w11.81: R52.1@438.98,1220.47 R5.1@438.98,1263.78 ; R52.1@458.66,1188.98 498.03,1149.61 v1(519.68,1149.61) ; R5.1@478.35,1303.15 478.35,1312.99 482.28,1316.93 616.14,1316.93 R7.2@631.89,1301.18 ; v1(611.86,1095) 615.05,1095 622.28,1087.77 645.27,1087.77 U4.5@650.36,1082.68 ; R7.2@661.42,1277.56 C5.1@696.85,1277.56 ; C5.1@713.78,1295.28 v1(724.06,1332.17) ; v1(1078.74,1293.31) TP2.TP@1159.45,1293.31
  Top Layer w31.5: C2.1@1393.7,1289.37 1425.2,1307.09 D1.1@1456.69,1307.09
  Bottom Layer w11.81: v1(519.68,1149.61) 576.42,1092.87 609.72,1092.87 v1(611.86,1095) ; v1(724.06,1332.17) 738.19,1293.31 v1(1078.74,1293.31)
VBAT_RAW: "TP1 VBAT_RAW.TP" F1.2 Q1.5 Q1.6 Q1.7 Q1.8
VBAT_SNS: D2.1 Q1.1 Q1.2 Q1.3 R2.1 U3.10 | length 116.1
  Top Layer w9.84: U3.10@1005.91,907.48 1053.15,907.48 1053.15,942.91 R2.1@1086.61,942.91
pads on no net: J2.7 J2.11 J2.15 J2.16 J2.18 J2.19 J2.21 J2.23 J2.24 J2.26 J2.27 J2.28 J2.29 J2.31 J2.32 J2.33 J2.35 J2.36 J12.2 J15.MP1 J15.MP2 J17.MP1 J17.MP2 U1.8 U1.9 U1.11 U1.12 U2.4 U6.4 U6.9 U7.3 U13.4

## Polygon pours and split planes (outlines as drawn)
GND on Top Layer "GND_TOP" (solid, remove dead copper, pour order 5): 15.75,118.11 17.72,98.14 23.54,78.94 33,61.24 45.73,45.73 61.24,33 78.94,23.54 98.14,17.72 118.11,15.75 2440.94,15.75 2460.91,17.72 2480.12,23.54 2497.81,33 2513.33,45.73 2526.06,61.24 2535.52,78.94 2541.34,98.14 2543.31,118.11 2543.31,2086.61 2541.34,2106.58 2535.52,2125.79 2526.06,2143.48 2513.33,2159 2497.81,2171.72 2480.12,2181.19 2460.91,2187.01 2440.94,2188.98 118.11,2188.98 98.14,2187.01 78.94,2181.19 61.24,2171.72 45.73,2159 33,2143.48 23.54,2125.79 17.72,2106.58 15.75,2086.61
GND on Bottom Layer "GND_BOT" (solid, remove dead copper, pour order 4): 15.75,118.11 17.72,98.14 23.54,78.94 33,61.24 45.73,45.73 61.24,33 78.94,23.54 98.14,17.72 118.11,15.75 2440.94,15.75 2460.91,17.72 2480.12,23.54 2497.81,33 2513.33,45.73 2526.06,61.24 2535.52,78.94 2541.34,98.14 2543.31,118.11 2543.31,2086.61 2541.34,2106.58 2535.52,2125.79 2526.06,2143.48 2513.33,2159 2497.81,2171.72 2480.12,2181.19 2460.91,2187.01 2440.94,2188.98 118.11,2188.98 98.14,2187.01 78.94,2181.19 61.24,2171.72 45.73,2159 33,2143.48 23.54,2125.79 17.72,2106.58 15.75,2086.61

## Keep-outs
Keep-Out Layer:
  rectangle: 11.81,1456.69 334.65,1937.01

## Other copper
Top Layer:
  rectangle net +5V_ACT: 1980.32,1070.87 2059.06,1084.65
  rectangle net +5V_ACT: 2196.85,1070.87 2374.02,1110.24
  rectangle net +5V_ACT: 1980.32,1011.81 2374.02,1019.69
  rectangle net GND: 1326.77,433.07 1484.25,531.5
  rectangle net GND: 1342.52,133.86 1374.02,181.1
  rectangle net GND: 1220.47,181.1 1492.13,433.07
  rectangle net +5V_SERVO: 2005.91,562.99 2149.61,592.52
  rectangle net +5V_SERVO: 2098.43,562.99 2149.61,645.67
  rectangle net +5V_ACT: 1980.31,1031.5 2019.68,1096.46
  rectangle net +5V_ACT: 1980.31,1019.69 2374.02,1070.87
  rectangle net +5V_ACT: 2297.24,700.79 2374.02,1669.29
  rectangle net +5V_ACT: 2374.02,1216.54 2429.13,1255.91
  rectangle net +5V_ACT: 2374.02,1622.05 2429.13,1661.42
  rectangle net +5V_ACT: 2204.72,700.79 2334.65,730.32
  rectangle net +5V: 1519.68,314.96 1555.12,377.95
  rectangle net +5V: 1503.94,370.08 1696.85,531.5
  rectangle net +5V: 1602.36,531.5 1696.85,948.82
  rectangle net +5V: 1696.85,877.95 1889.76,1000
  rectangle net +5V: 1860.24,1000 1929.13,1062.99
  rectangle net +5V: 1887.8,1062.99 1925.2,1114.17
  rectangle net VBAT_IN: 484.25,688.98 598.43,807.09
  rectangle net VBAT_PROTECTED: 1216.54,1263.78 1267.72,1285.43
  rectangle net VBAT_PROTECTED: 1259.84,1147.64 1409.45,1283.46
  rectangle net VBAT_PROTECTED: 1259.84,984.25 1322.83,1078.74
  rectangle net VBAT_PROTECTED: 1228.35,826.77 1275.59,992.13
  rectangle net VBAT_PROTECTED: 1074.8,753.94 1273.62,850.39
  rectangle net VBAT_PROTECTED: 1110.24,511.81 1273.62,771.65
  rectangle net VBAT_SNS: 1074.8,1035.43 1118.11,1094.49
  rectangle net VBAT_SNS: 1047.24,956.69 1086.61,1017.72
  rectangle net VBAT_SNS: 950.39,1017.72 1086.61,1082.68
  rectangle net VBAT_RAW: 710.63,1018.11 858.27,1107.87
  rectangle net VBAT_RAW: 710.63,956.69 795.28,1181.1
  rectangle net VBAT_RAW: 710.63,866.14 763.78,956.69

## Silkscreen, mask and mechanical layers (free items; w line width, h text height)
Top Overlay:
  drawing of 29 lines, arcs and shapes, not listed
  text "SAFE_OK" at 825,1885 h31.5
  text "5V" at 1100,1860 h31.5
  text "Power Management & Controls Board" at 22.7,1810 h45
  text "5V Heart Beat" at 2062.99,1730.66 h31.5
  text "SDR-AHPR" at 60,1655 h31.5
  text "+" at 496.67,1638.33 h39.37
  text "SENSOR" at 2359.09,1535.91 h31.5 r90
  text "3V3" at 1370,1480 h31.5
  text "TP3 GND" at 970,1445 h31.5
  text "5VA" at 2205,1370 h31.5
  text "ACT" at 2205,1330 h31.5
  text "VBAT" at 1035,1325 h31.5
  text "Motor Safe Enable" at 1880,1310 h30
  text "." at 1420,1295 h30
  text "DEPLOY" at 2354.09,1110.91 h31.5 r90
  text "TP1 VBAT RAW" at 690,1025 h31.5
  text "Sensor Board Conn." at 20,920 h31.5
  text "+" at 2305,802.13 h39.37
  text "DXL IN" at 2375.91,745.91 h31.5 r90
  text "+" at 432,672.37 h39.37
  text "-" at 919.72,672.37 h39.37
  text "Range Finder Conn." at 23.62,664.37 h31.5
  text "BATT XT60 Conn." at 1015,650 h31.5 r270
  text "+" at 2020,595 h39.37
  text "A Bjorn Board   2026" at 1870,45 h50
  text "+" at 330,25 h50
  text "-" at 1015,20 h50
Bottom Overlay:
  text "1" at 277.37,1974.41 h39.37
  text "SENSOR ID2" at 2404.72,1787.41 h31.5
  text "DXL_DATA" at 2404.72,1727.04 h31.5
  text "5V_ACT" at 2404.72,1628.61 h31.5
  text "GND" at 2404.72,1527.56 h31.5
  text "DEPLOY ID1" at 2404.72,1381.89 h31.5
  text "SENSOR BOARD" at 396.86,1355.32 h31.5
  text "DXL_DATA" at 2404.72,1321.53 h31.5
  text "3V3" at 113.49,1298.23 h31.5
  text "GND" at 113.49,1249.02 h31.5
  text "5V_ACT" at 2404.72,1223.1 h31.5
  text "SDA" at 113.49,1199.81 h31.5
  text "SCL" at 113.49,1150.6 h31.5
  text "GND" at 2404.72,1122.05 h31.5
  text "DXL IN (U2D2)" at 2404.72,976.38 h31.5
  text "DXL_DATA" at 2404.72,916.01 h31.5
  text "NC" at 2404.72,814.97 h31.5
  text "GND" at 2404.72,716.54 h31.5
  text "SERVO" at 2255,610 h31.5
  text "RANGEFINDER" at 360.13,607.29 h31.5
  text "3V3" at 113.49,550.2 h31.5
  text "SERVO_PWM" at 2255,545 h31.5
  text "GND" at 109.23,501.03 h31.5
  text "5V_SERVO" at 2246.72,459.46 h31.5
  text "TX" at 82,451.78 h31.5
  text "RX" at 82,402.56 h31.5
  text "GND" at 2250,355 h31.5

## Text inside footprints (layer, text, board x,y; h text height)
U4: Mechanical 13 "*" at 570.36,1089.68 h50
U5: Top Overlay "*" at 1153.97,1818.18 h50; Mechanical 13 "*" at 1153.97,1818.18 h50
U7: Top Assembly "Designator9" at 1976.45,1597.75 h50 r270